# Altium PCB BLE_product-v1.2.PcbDoc (part 2 of 2)
Units mil, origin at the board's own origin, x right, y up, seen from the top; angles counter-clockwise.
Board outline 629.8 x 648.96 mil, 4 copper layers (Top Layer, Layer 2, Layer 3, Bottom Layer), stack 39.334 mil thick; 45 components, 32 nets, 192 pads, 79 vias.
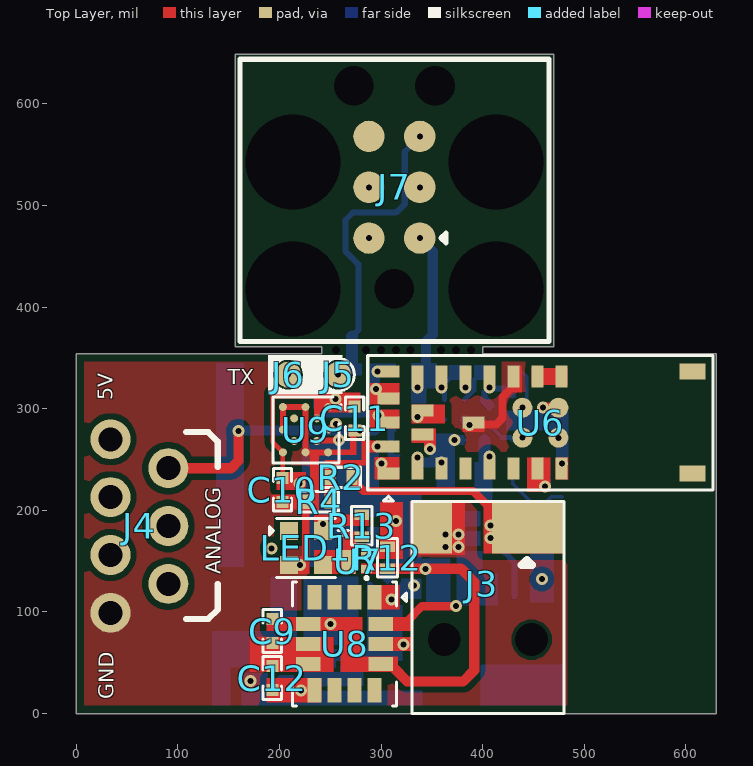
[diagram p0: Top Layer view]

## Other copper (continued)
Top Layer: (continued)
  rectangle net GND: 230.16,200.55 238.95,259.75
  rectangle net 3V: 191.28,272.37 195.78,316.24
  rectangle net 3V: 191.38,309.89 240.44,316.24
  rectangle net NetC8_2: 443.61,218.11 466.86,251.83
  rectangle net 3V: 197.11,219.92 226.04,237.91
  rectangle net CLR_POWER: 329.96,285.72 363.13,303.95
  rectangle net GND: 170.4,40.88 253.47,75.53
  rectangle net 5V_USB: 400.83,157.4 480.06,208.58
  rectangle net POWER_DET: 244.42,202.09 255.05,249.4
  rectangle net GND: 222.26,137.32 229.68,209.37
  rectangle net GND: 192.44,200.65 233.39,215.65
  rectangle net 5V: 233.93,170.78 251.65,195.65
  rectangle net 5V: 233.93,184.56 288.31,195.7
  rectangle net GND: 291.71,102.3 318.11,126.37
  rectangle net GND: 200.47,137.32 226.06,155.03
  rectangle net HV_LED_DATA: 233.93,137.32 275.04,161.13
  rectangle net HV_LED_DATA: 262.77,137.5 275.27,179.32
  rectangle net LED_DATA: 280.16,152.27 321.61,162.9
  rectangle net 3V: 280.16,137.17 321.61,147.8
  rectangle net 3V: 259.97,40.88 281.83,95.21
  rectangle net GND: 170.4,47.48 240.25,63.38
  rectangle net 3V: 265.12,40.88 316.9,56.14
  rectangle net GND: 199.14,40.88 210.95,75.14
  rectangle net NetU6_11: 448.07,323.27 483.51,339.87
  rectangle net I2C.SCL: 292.89,61.75 329.96,75.53
  rectangle net I2C.SDA: 292.89,81.43 329.96,95.21
Layer 3:
  rectangle net 5V_USB: 398.6,123.18 414.94,196.88
Bottom Layer:
  rectangle net VBAT#: 391.86,210.28 409.86,247.5
  rectangle net NetL1_1: 259.54,26.43 282.59,48.05
  rectangle net NetSW1_3: 137.6,144.28 165.16,345.07
  rectangle net GND: 162.61,8 188.88,39.98
  rectangle net VBAT: 133.88,45.32 217.47,81.48
  rectangle net VBAT: 133.88,8 151.88,60.21
  rectangle net 5V: 223.64,44.82 255.64,63.33
  rectangle net 5V: 223.64,51.71 321.22,63.33
  rectangle net VBAT: 347.81,246.98 372.86,275.73
  rectangle net VBAT: 354.86,222.5 372.86,274.98
  rectangle net NetC8_2: 447.12,220.76 467.49,232.46
  rectangle net 5V: 286.37,53.93 321.37,106.91
  rectangle net GND: 222.25,144.28 277.67,268.2
  rectangle net GND: 223.23,202.69 298.1,268.2
  rectangle net VBAT: 362.36,264.49 382.04,274.14
  rectangle net 5V_USB: 374.18,106.26 415.08,138
  rectangle net VBAT#: 397.8,8 479.96,48.05
  rectangle net 3V: 422.88,278.74 484.38,298.52
  rectangle net VBAT: 289.34,308.41 299.16,344.55
  rectangle net GND: 344.46,102.76 368.28,152.55
  rectangle net 3V: 329.44,305.24 344.53,333.83
  rectangle net 3V: 329.44,320.11 355.16,344.93
  rectangle net VBAT: 191.05,45.32 217.47,135
  rectangle net VBAT: 168.73,45.42 193.89,81.48
  rectangle net GND: 171.48,10.43 183.25,32.27
  rectangle net NetL1_1: 223.64,26.43 282.59,41.12
  rectangle net VBAT: 289.6,332.74 315.28,344.55
  rectangle net GND: 236.78,332.74 281.37,344.43
  rectangle net NetR3_1: 349.81,164.89 397.8,179.84
  rectangle net 3V: 422.88,286.29 443.04,297.43
  rectangle net I2C.SDA: 391.65,328.36 410.14,342.93
  region net I2C.SCL: 385.67,342.93 366.18,342.93 366.18,328.36 385.67,328.36
  rectangle net 3V: 472.45,230.91 484.51,283.45
  rectangle net GND: 168.89,8 340.59,22.51
  rectangle net VBAT: 446.42,109.35 470.05,160.15
  rectangle net GND: 311.53,138.43 359.5,152.55
  region net GND: 293.18,139.79 306.49,126.48 327.19,147.18 313.88,160.49
  rectangle net GND: 262.02,193.62 323.84,220.24
  rectangle net GND: 306.33,150.04 340.09,220.24
  rectangle net GND: 223.23,147.58 268.48,268.29
  rectangle net GND: 237.33,238.91 285.87,268.2
  rectangle net GND: 268.48,238.93 279.2,268.2
  rectangle net NetL1_1: 228.64,29.67 244.39,38.26
  rectangle net 5V: 228.64,45.42 244.39,54.01
  rectangle net 5V_USB: 374.18,106.26 399.79,160.15
  rectangle net NetL1_1: 223.64,67.28 277.67,135
  rectangle net NetR5_1: 349.81,184.33 397.8,199.52
  rectangle net ENABLE: 304.48,310.16 315.5,323.82
  rectangle net ENABLE: 319.91,112.79 339.68,132.74
  rectangle net 3V: 286.37,154.91 298.25,183.68
  rectangle net 5V: 286.37,87.81 298.25,121.25
  rectangle net 5V: 286.37,56.04 321.37,87.81
  rectangle net VBAT: 168.89,45.42 212.9,54.01

## Silkscreen, mask and mechanical layers (free items; w line width, h text height)
Top Overlay:
  region: 253.31,314.57 261.72,314.57 261.72,315.03 261.72,318.2 cw(c259.33,323.96) 256.94,318.2 253.13,318.2 253.13,318.54 cw(c253.13,325.8) 247.99,320.67 246.35,322.31 cw(c257.39,333.35) 241.78,333.35 241.78,333.51 cw(c253.38,333.51) 245.17,341.72 251.82,348.36 258.62,348.68 ccw(c251.1,349.8) 258.14,352.68 236.71,352.68 235.13,314.57 237.56,314.57
  region: 256.94,352.7 261.72,352.7 261.72,350.05 261.11,349.45 260.95,349.61 256.46,349.61 256.46,350.23 ccw(c251.64,350.24) 255.99,352.31 cw(c256.94,351.36)
  region: 237.4,352.68 cw(c211.67,343.92) 236.78,333.51 224.6,333.51 224.56,333.47 224.56,334.31 ccw(c210.59,334.32) 220.47,344.2 217.66,347.01 ccw(c215.82,345.18) 215.82,347.77 ccw(c217.08,349.3) 217.27,347.33 ccw(c207.51,327.81) 200.59,348.51 198.33,346.25 197.25,347.33 ccw(c195.02,345.12) 195.02,348.26 cw(c195.02,351.29) 192.87,349.14 189.33,352.68
  region: 212.94,352.68 189.12,352.68 189.12,314.49 237.57,314.49 236.78,333.51 224.56,333.51 224.56,333.47 cw(c208.69,333.46) 219.9,322.23 219.88,322.2 cw(c208.57,333.49) 208.56,317.51 207.6,317.51 cw(c207.59,331.06) 198.02,321.48 193.92,325.58 192.48,339.04 ccw(c192.57,340.72) 194.25,340.67 197.48,343.89 ccw(c195.64,345.73) 195.02,348.26
  lines w3: 190.14,183.85 190.14,175.85 194.25,179.96 190.14,184.07 ; 257.77,180.32 267.77,180.32 ; 262.77,175.32 262.77,185.32 ; 324.91,110.21 320.8,114.33 324.91,118.44 324.91,110.44 ; 330.36,208.58 330.36,0 479.96,0 479.96,208.58 ; 302.31,209.05 312.31,209.05 307.36,214 302.31,209.05
  lines w6: 108.22,93.11 130.06,93.11 139.32,102.36 139.32,127.61 ; 108.22,277 130.06,277 139.32,267.74 139.32,242.5
  text "TX" at 148.99,319.21 h25
  text "5V" at 40.84,308.31 h25 r90
  text "ANALOG" at 146.98,137.22 h25 r90
  text "GND" at 41.99,14.28 h25 r90
Bottom Overlay:
  drawing of 20 lines, arcs and shapes, not listed
  text "B" at 409.07,18.26 h20
Board Outline:
  lines w3: 629.8,0 0,0 0,354.33 241.83,354.33 241.83,361 156.45,361 156.45,648.96 469.98,648.96 469.98,360.92 400.1,360.92 400.1,354.33 452.68,354.33 629.8,354.33 ; 629.8,0 629.8,354.33 ; 629.8,0 629.8,0 ; 629.8,354.33 629.8,354.33
Fabrication:
  drawing of 295 lines, arcs and shapes, not listed
  text "Layer" at -1285.18,2390 h60
  text "Name" at -875.26,2390 h60
  text "Material" at 54.48,2390 h60
  text "Thickness" at 914.25,2390 h60
  text "Constant" at 1564.08,2390 h60
  text "Board Layer Stack" at 2133.94,2390 h60
  text "Top Overlay" at -875.26,2270 h60
  text "Top Solder" at -875.26,2150 h60
  text "Solder Resist" at 54.48,2150 h60
  text "0.010mm" at 914.25,2150 h60
  text "3.5" at 1564.08,2150 h60
  text "1" at -1285.18,2030 h60
  text "Top Layer" at -875.26,2030 h60
  text "0.035mm" at 914.25,2030 h60
  text "Dielectric 2" at -875.26,1910 h60
  text "PP-017" at 54.48,1910 h60
  text "0.130mm" at 914.25,1910 h60
  text "4.3" at 1564.08,1910 h60
  text "2" at -1285.18,1790 h60
  text "Layer 2" at -875.26,1790 h60
  text "CF-004" at 54.48,1790 h60
  text "0.035mm" at 914.25,1790 h60
  text "Dielectric 1" at -875.26,1670 h60
  text "FR-4" at 54.48,1670 h60
  text "0.600mm" at 914.25,1670 h60
  text "4.8" at 1564.08,1670 h60
  text "3" at -1285.18,1550 h60
  text "Layer 3" at -875.26,1550 h60
  text "CF-004" at 54.48,1550 h60
  text "0.035mm" at 914.25,1550 h60
  text "Dielectric 3" at -875.26,1430 h60
  text "PP-017" at 54.48,1430 h60
  text "0.130mm" at 914.25,1430 h60
  text "4.3" at 1564.08,1430 h60
  text "4" at -1285.18,1310 h60
  text "Bottom Layer" at -875.26,1310 h60
  text "0.035mm" at 914.25,1310 h60
  text "Bottom Solder" at -875.26,1190 h60
  text "Solder Resist" at 54.48,1190 h60
  text "0.010mm" at 914.25,1190 h60
  text "3.5" at 1564.08,1190 h60
  text "Bottom Overlay" at -875.26,1070 h60
  text "Total board thickness:" at -1285.18,950 h60
  text "1.019mm" at 914.25,950 h60
Drill Drawing:
  circle w10: c1571.62,65.83 r33.33
  lines w10: 1538.29,-50.83 1604.96,-50.83 1571.62,-117.5 1538.29,-50.83 ; 1538.29,182.5 1604.96,182.5 1604.96,249.17 1538.29,249.17 1538.29,182.5 ; 1538.29,332.5 1538.29,349.17 1554.96,365.83 1538.29,382.5 1538.29,399.17 1554.96,399.17 1571.62,382.5 1588.29,399.17 1604.96,399.17 1604.96,382.5 1588.29,365.83 1604.96,349.17 1604.96,332.5 1588.29,332.5 1571.62,349.17 1554.96,332.5 1538.29,332.5 ; 1538.29,499.17 1554.96,499.17 1554.96,482.5 1588.29,482.5 1588.29,499.17 1604.96,499.17 1604.96,532.5 1588.29,532.5 1588.29,549.17 1554.96,549.17 1554.96,532.5 1538.29,532.5 1538.29,499.17 ; 1538.29,649.17 1554.96,649.17 1571.62,632.5 1588.29,649.17 1604.96,649.17 1588.29,665.83 1604.96,682.5 1588.29,682.5 1571.62,699.17 1554.96,682.5 1538.29,682.5 1554.96,665.83 1538.29,649.17
  lines w15: 1478.5,-162.5 11959.6,-162.5 ; 1478.5,737.5 11959.6,737.5 ; 2029.38,-312.5 2029.38,887.5 ; 2569.24,-312.5 2569.24,887.5 ; 3668.92,-312.5 3668.92,887.5 ; 4174.79,-312.5 4174.79,887.5 ; 4908.59,-312.5 4908.59,887.5 ; 6408.14,-312.5 6408.14,887.5 ; 6997.99,-312.5 6997.99,887.5 ; 7743.79,-312.5 7743.79,887.5 ; 8393.62,-312.5 8393.62,887.5 ; 9247.38,-312.5 9247.38,887.5 ; 10580.99,-312.5 10580.99,887.5 ; 1478.5,-312.5 11959.6,-312.5 11959.6,887.5 1478.5,887.5 1478.5,-312.5
  text "Symbol" at 1568.5,782.5 h72
  text "Count" at 2074.38,782.5 h72
  text "Hole Size" at 2614.24,782.5 h72
  text "Plated" at 3713.92,782.5 h72
  text "Hole Type" at 4219.79,782.5 h72
  text "Drill Layer Pair" at 4953.59,782.5 h72
  text "Via/Pad" at 6453.14,782.5 h72
  text "Pad Shape" at 7042.99,782.5 h72
  text "Template" at 7788.79,782.5 h72
  text "Description" at 8438.62,782.5 h72
  text "Hole Tolerance (+)" at 9292.38,782.5 h72
  text "Hole Tolerance (-)" at 10625.99,782.5 h72
  text "2" at 2074.38,632.5 h60
  text "0.820mm (32.28mil)" at 2614.24,632.5 h60
  text "NPTH" at 3713.92,632.5 h60
  text "Round" at 4219.79,632.5 h60
  text "Top Layer - Bottom Layer" at 4953.59,632.5 h60
  text "Pad" at 6453.14,632.5 h60
  text "Rounded" at 7042.99,632.5 h60
  text "c0hn82m10" at 7788.79,632.5 h60
  text "3" at 2074.38,482.5 h60
  text "0.991mm (39.02mil)" at 2614.24,482.5 h60
  text "NPTH" at 3713.92,482.5 h60
  text "Round" at 4219.79,482.5 h60
  text "Top Layer - Bottom Layer" at 4953.59,482.5 h60
  text "Pad" at 6453.14,482.5 h60
  text "Rounded" at 7042.99,482.5 h60
  text "c0hn99" at 7788.79,482.5 h60
  text "4" at 2074.38,332.5 h60
  text "2.375mm (93.50mil)" at 2614.24,332.5 h60
  text "NPTH" at 3713.92,332.5 h60
  text "Round" at 4219.79,332.5 h60
  text "Top Layer - Bottom Layer" at 4953.59,332.5 h60
  text "Pad" at 6453.14,332.5 h60
  text "Rounded" at 7042.99,332.5 h60
  text "c0hn238" at 7788.79,332.5 h60
  text "7" at 2074.38,182.5 h60
  text "0.600mm (23.62mil)" at 2614.24,182.5 h60
  text "PTH" at 3713.92,182.5 h60
  text "Round" at 4219.79,182.5 h60
  text "Top Layer - Bottom Layer" at 4953.59,182.5 h60
  text "Pad" at 6453.14,182.5 h60
  text "Rounded" at 7042.99,182.5 h60
  text "c100h60" at 7788.79,182.5 h60
  text "8" at 2074.38,32.5 h60
  text "0.200mm (7.87mil)" at 2614.24,32.5 h60
  text "NPTH" at 3713.92,32.5 h60
  text "Round" at 4219.79,32.5 h60
  text "Top Layer - Bottom Layer" at 4953.59,32.5 h60
  text "Pad" at 6453.14,32.5 h60
  text "Rounded" at 7042.99,32.5 h60
  text "c0hn20" at 7788.79,32.5 h60
  text "12" at 2074.38,-117.5 h60
  text "0.150mm (5.91mil)" at 2614.24,-117.5 h60
  text "PTH" at 3713.92,-117.5 h60
  text "Round" at 4219.79,-117.5 h60
  text "Top Layer - Bottom Layer" at 4953.59,-117.5 h60
  text "Via" at 6453.14,-117.5 h60
  text "Rounded" at 7042.99,-117.5 h60
  text "v30h15" at 7788.79,-117.5 h60
  text "36 Total" at 2074.38,-267.5 h60

## Dimensions
0,0 to 157,13 on Dimensions
0,354.33 to 629.8,354.33 on Dimensions
0,354.33 to 0,0 on Dimensions
629.8,354.33 to 469.98,648.96 on Dimensions
629.8,0 to 489.96,-86.69 on Dimensions
479.96,0 to 469.98,648.96 on Dimensions
629.8,354.33 to 489.96,-86.69 on Dimensions
629.8,354.33 to 488.07,354.33 on Dimensions